# Altium PCB Serilizer_V10.PcbDoc
Units mm, origin at the board's own origin, x right, y up, seen from the top; angles counter-clockwise.
Board outline 32.5 x 29 mm, 4 copper layers (L1 TOP, L2 GND/POWER, L3 GND, L4 BOTTOM), stack 1.584 mm thick; 55 components, 30 nets, 154 pads, 136 vias.
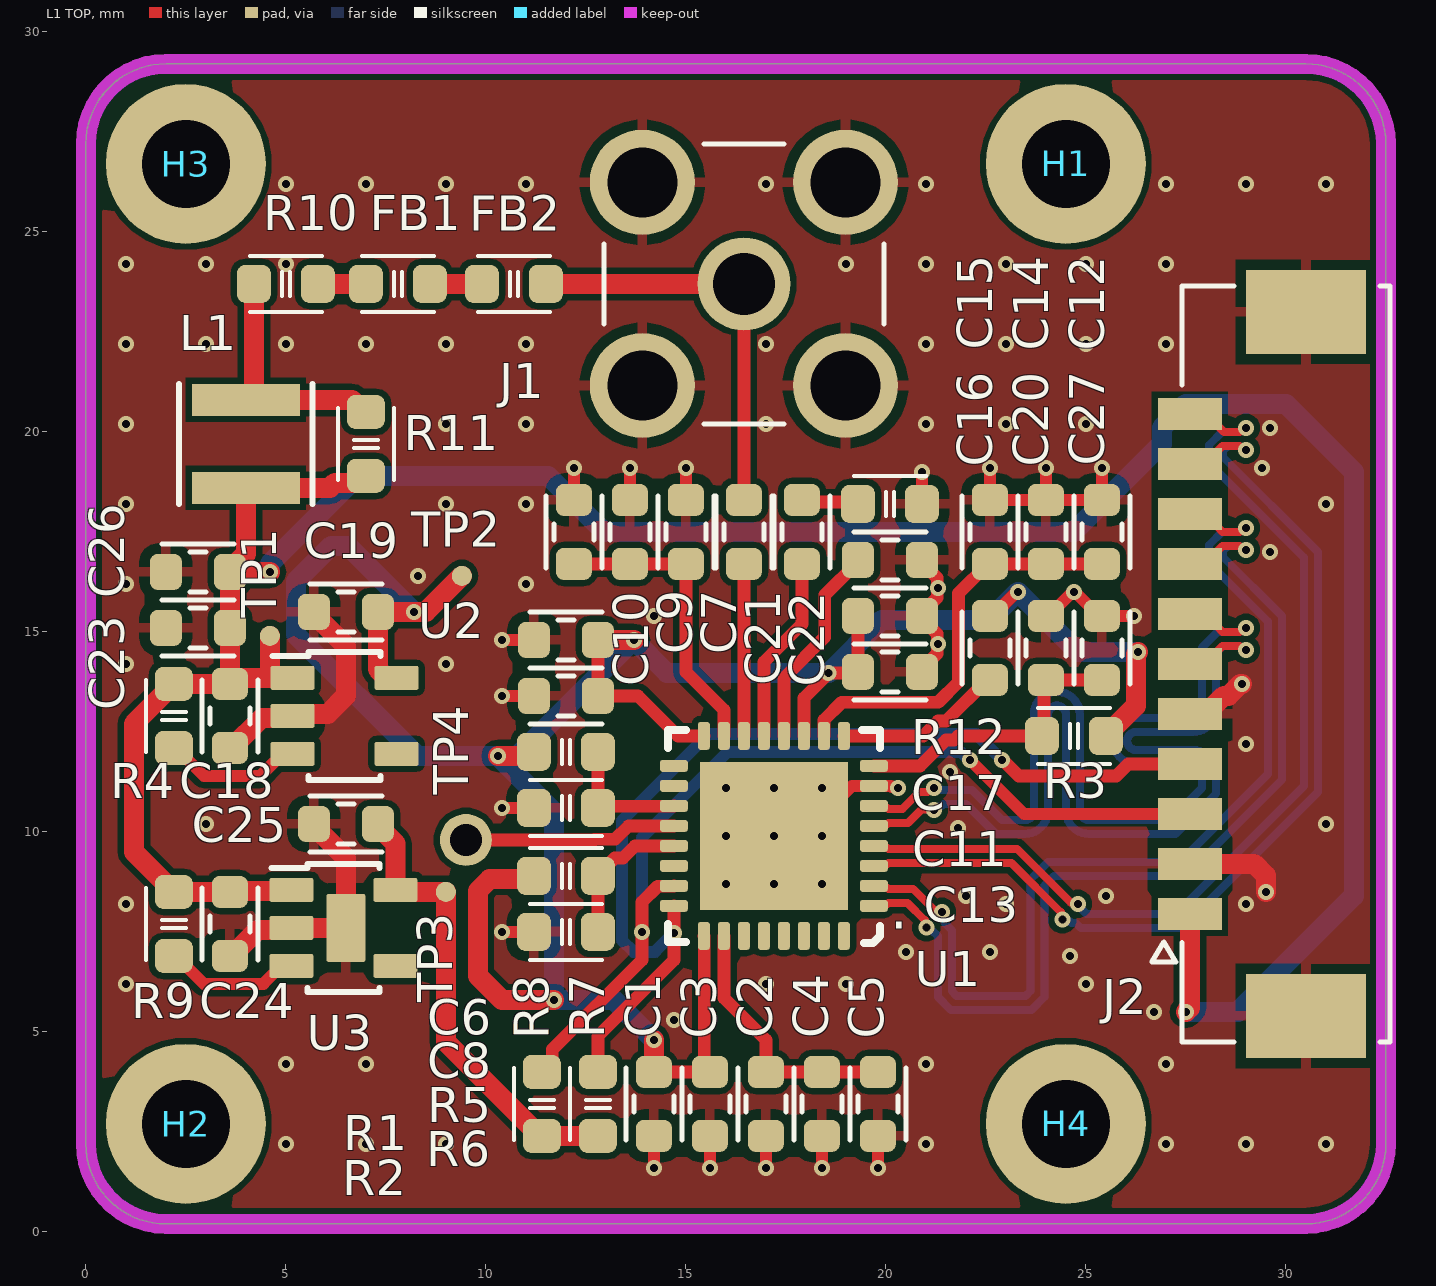
[diagram p0: L1 TOP view]
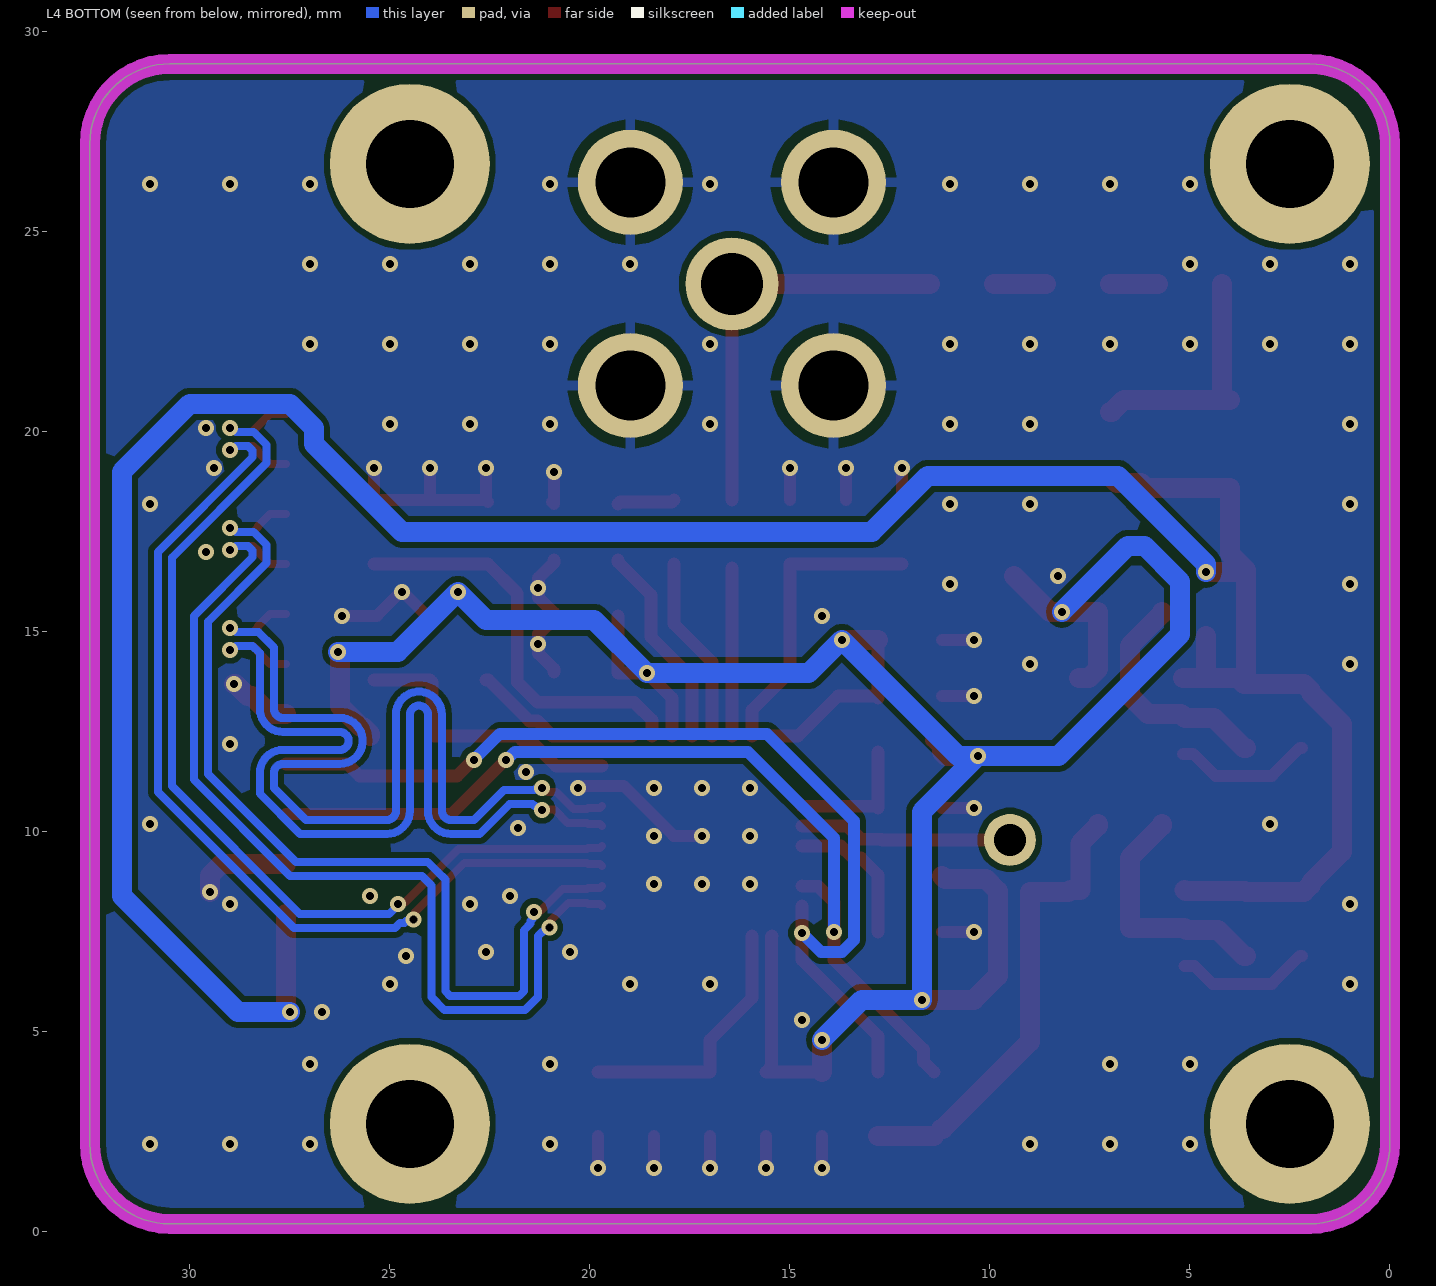
[diagram p1: L4 BOTTOM view, seen from below]
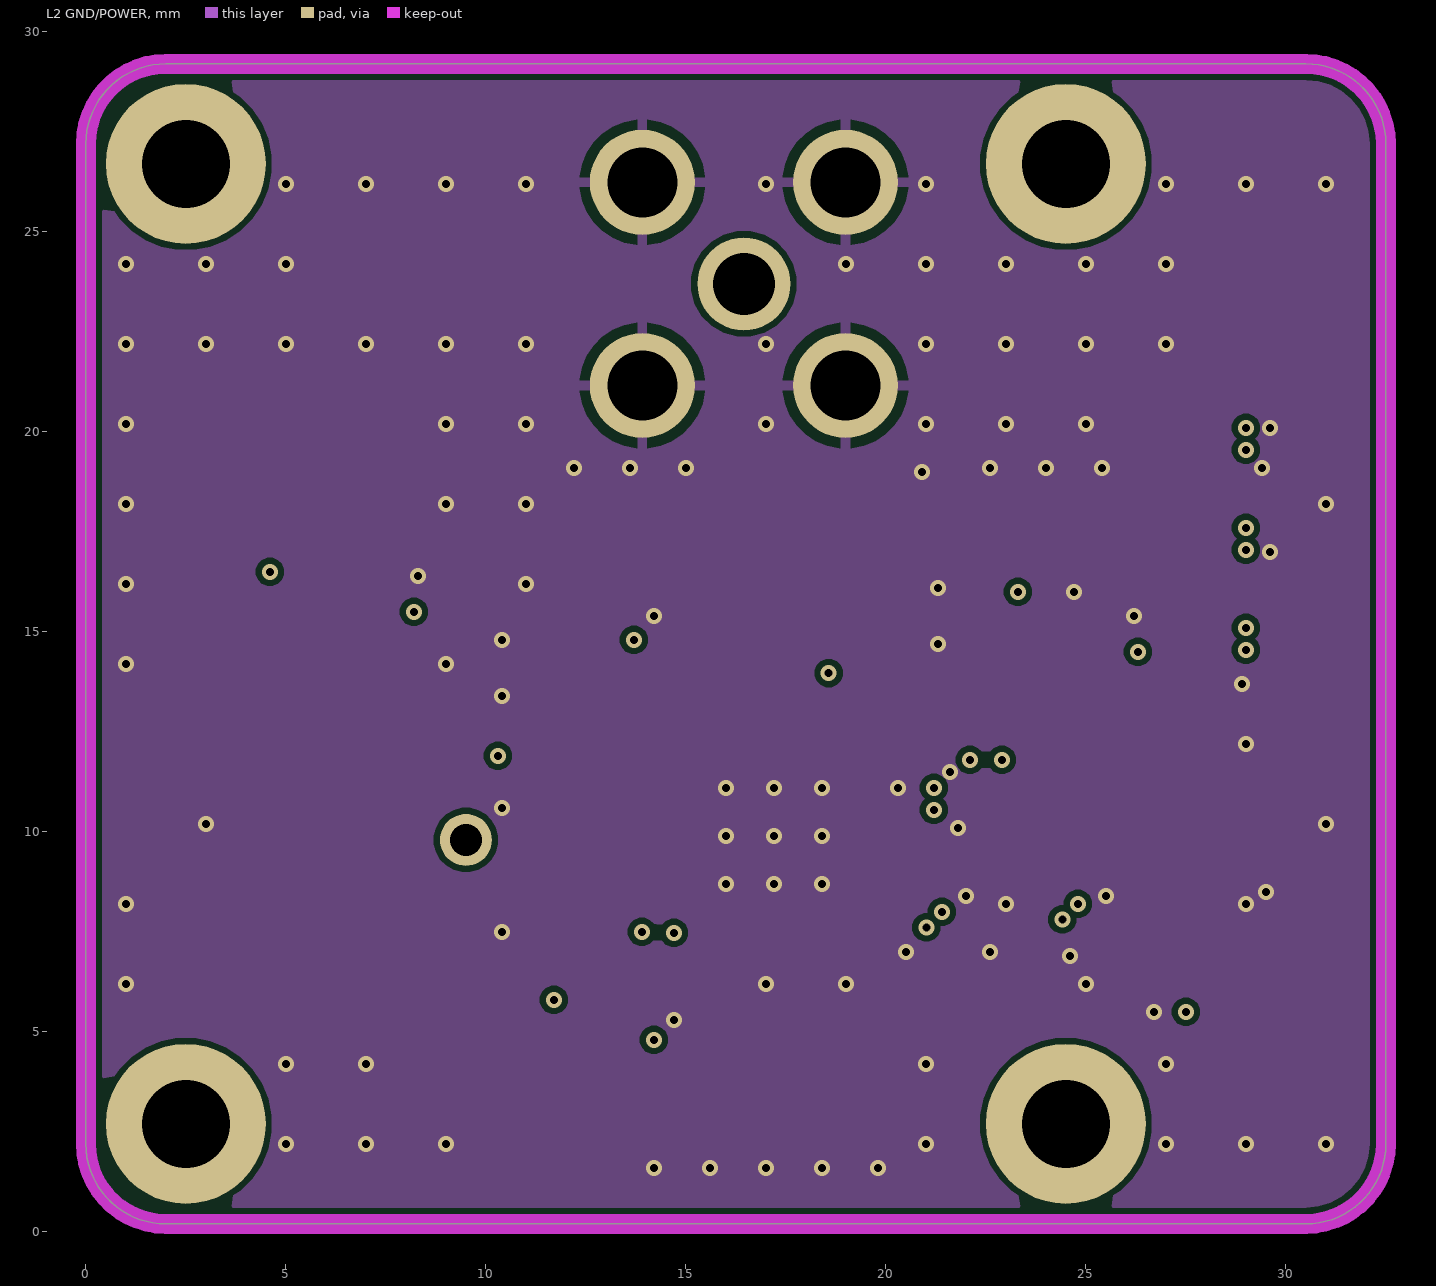
[diagram p2: L2 GND/POWER]
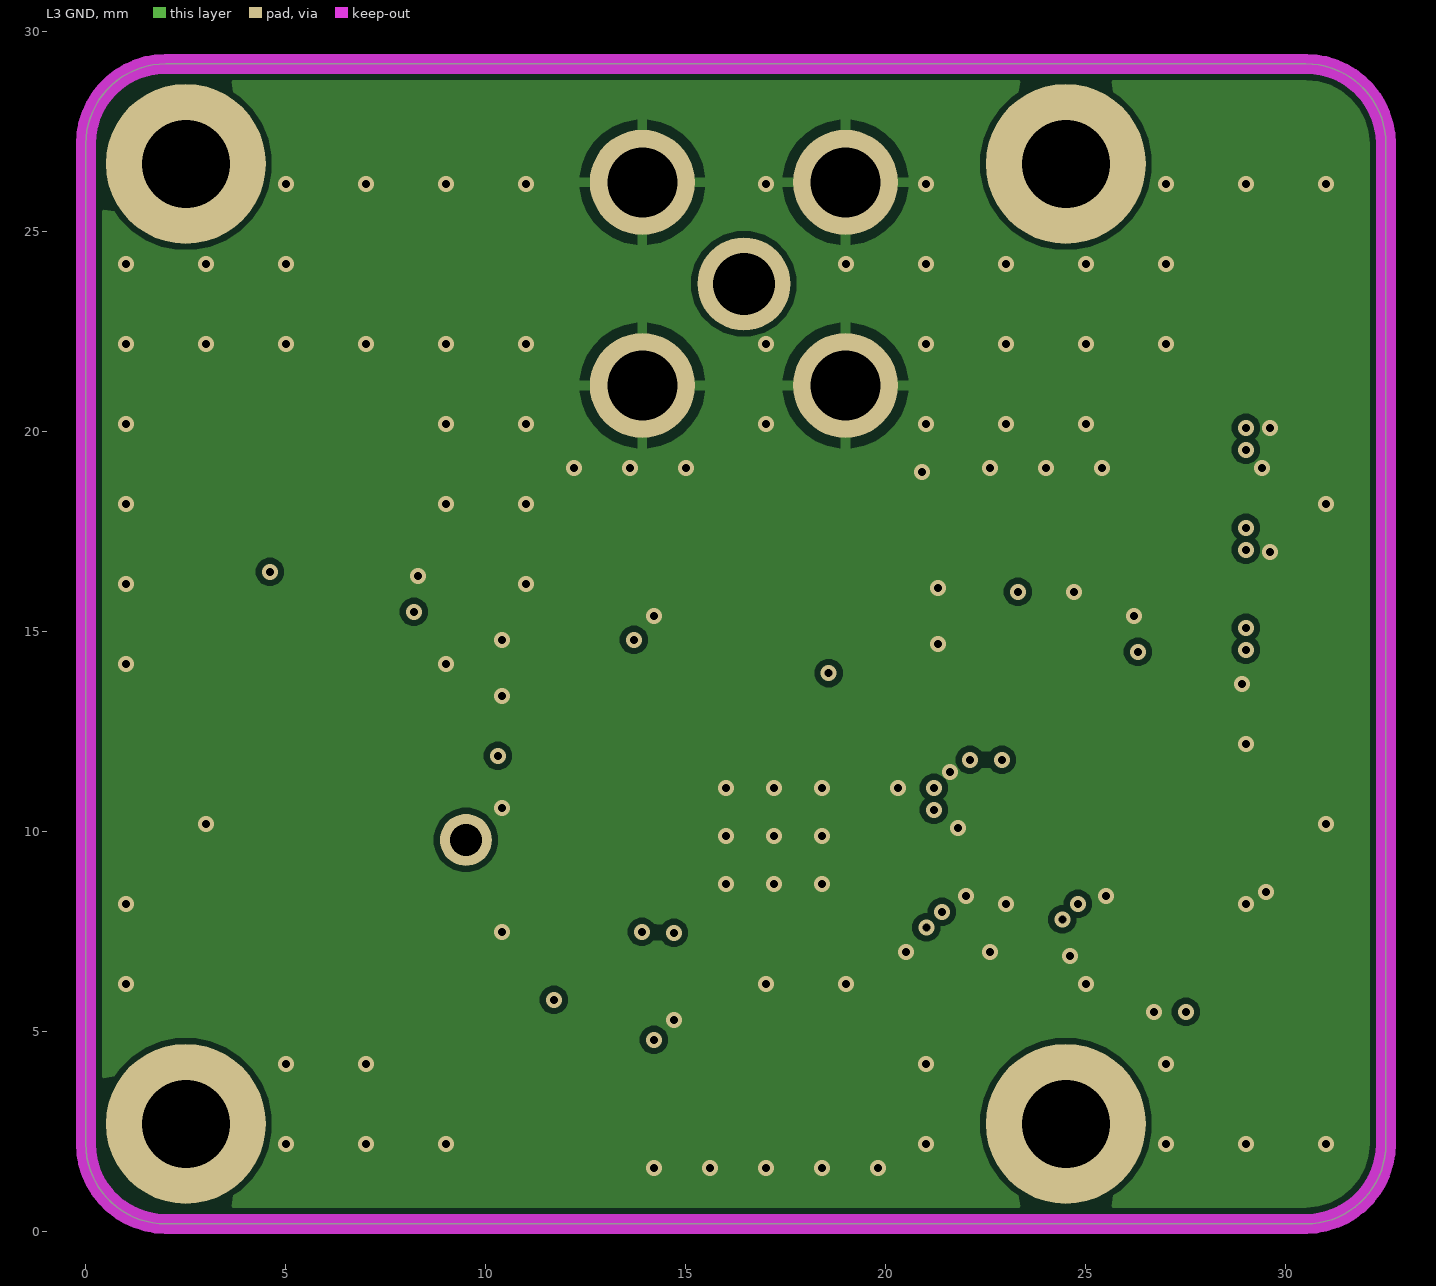
[diagram p3: L3 GND]
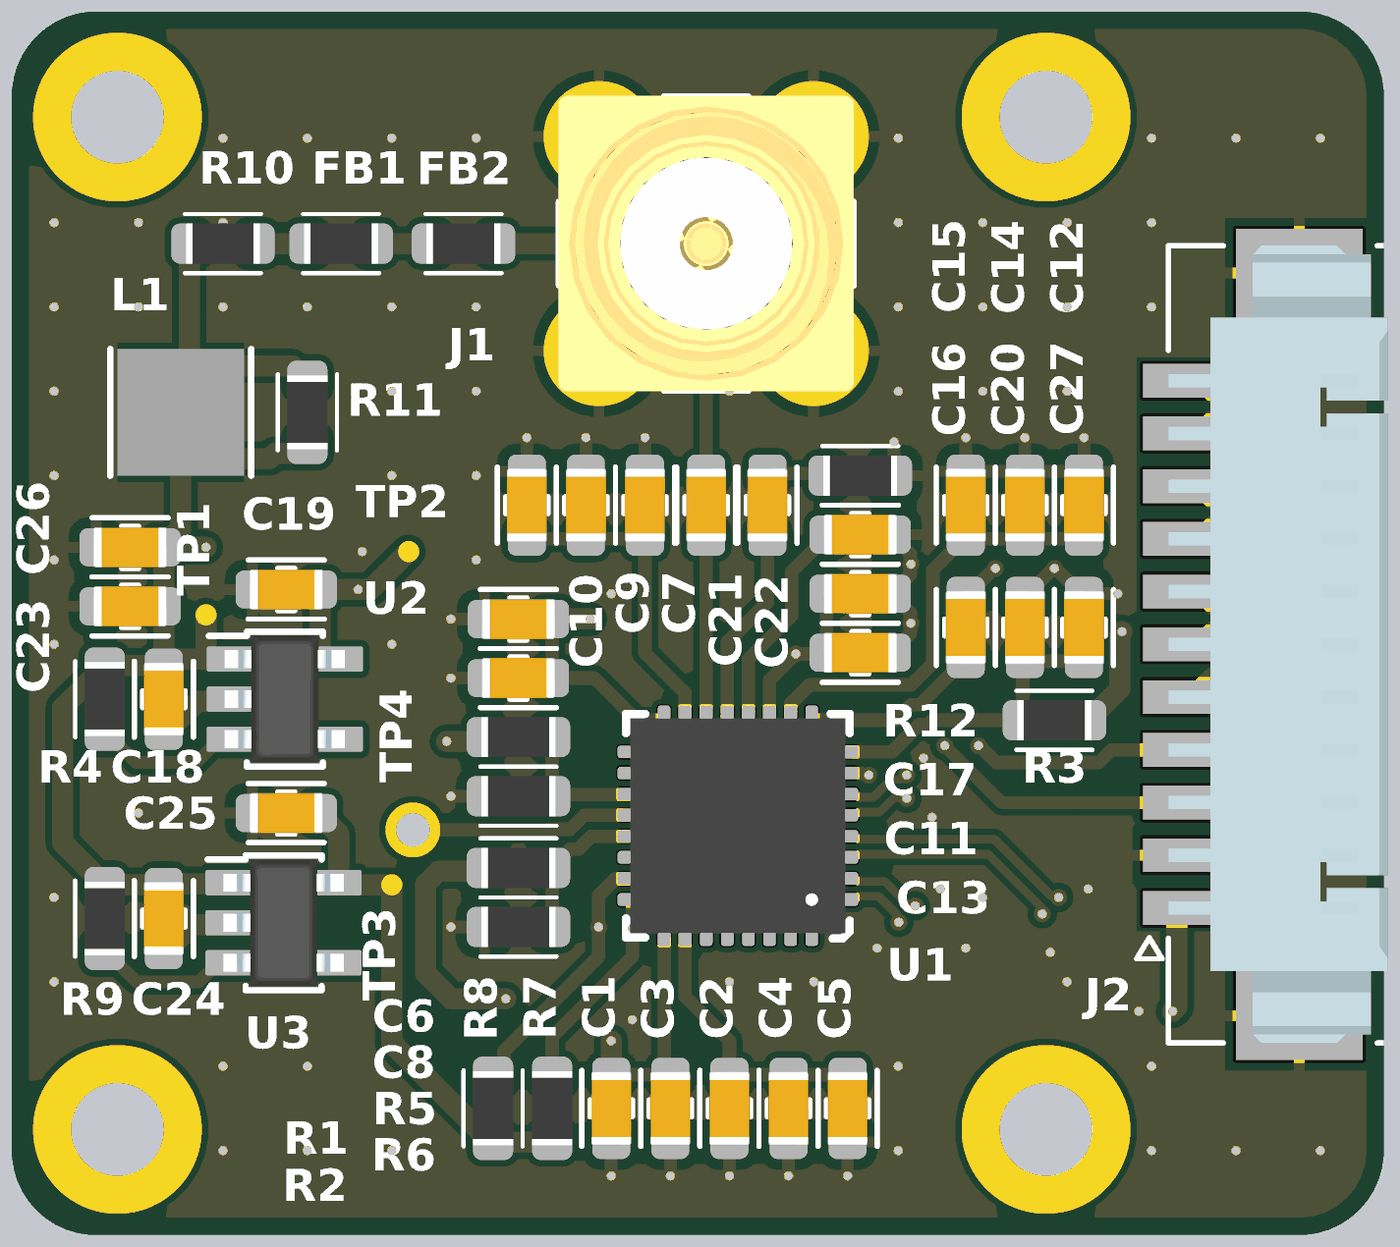
[diagram p4: 3D render of the assembled board from above, using the file's embedded part models]

## Layer stack, top to bottom
Top Solder: solder mask 0.0102, Solder Resist, Dk 3.5
L1 TOP: signal copper 0.04
Dielectric 2: prepreg 0.2, PP-006, Dk 4.5
L2 GND/POWER: signal copper 0.032
Dielectric 1: dielectric 1.04, FR-4, Dk 4.8
L3 GND: signal copper 0.032
Dielectric 3: prepreg 0.2, PP-006, Dk 4.5
L4 BOTTOM: signal copper 0.04
Bottom Solder: solder mask 0.0102, Solder Resist, Dk 3.5

## Board outline
0,2.2 0,27.2 cw(c2,27.2) 2,29.2 30.5,29.2 cw(c30.5,27.2) 32.5,27.2 32.5,2.2 cw(c30.5,2.2) 30.5,0.2 2,0.2 cw(c2,2.2)

## Design rules (kind name [scope] priority, off if disabled: settings)
Clearance [All] p1: gap=0.15 ignorepadtopadclearanceinfootprint=FALSE
DiffPairsRouting [InDifferentialPairClass('DIFF100')] p1: maxlimit=0.15 minlimit=0.127 mostfreqgap=0.15 toplayer_mingap=0.15 toplayer_minwidth=0.2 toplayer_maxwidth=0.2 toplayer_prefwidth=0.2 midlayer1_maxgap=0.127 midlayer1_prefgap=0.127 midlayer1_minwidth=0.069 midlayer1_maxwidth=0.069 midlayer1_prefwidth=0.069 midlayer2_maxgap=0.127 midlayer2_prefgap=0.127 midlayer2_minwidth=0.069 midlayer2_maxwidth=0.069 midlayer2_prefwidth=0.069 bottomlayer_mingap=0.15 bottomlayer_minwidth=0.2 bottomlayer_maxwidth=0.2 bottomlayer_prefwidth=0.2 impedanceprofiledriven=TRUE impedanceprofileid={50D43195-B933-46E9-9240-D5212A9A5187} impedanceprofilevalue=100.000000 maxuncoupledlength=12.7
MatchedLengths MatchedLengths_1 [InNetClass('MIPI1')] p1: tolerance=0.15 checknetsindiffpair=FALSE checkdiffpairvsdiffpair=TRUE checkxsignals=TRUE checkothers=TRUE
MatchedLengths [InNetClass('DIFF100')] p2: tolerance=0.05 checknetsindiffpair=TRUE checkdiffpairvsdiffpair=FALSE checkxsignals=FALSE checkothers=FALSE
MinimumSolderMaskSliver [All] p1: minsoldermaskwidth=0.12
PolygonConnect PolygonConnect_GND [InNet('GND')] p1: thpad.connectstyle=Relief thpad.reliefconductorwidth=0.254 thpad.reliefentries=4 thpad.polygonreliefangle="90 Angle" thpad.airgapwidth=0.254 smdpad.connectstyle=Relief smdpad.reliefconductorwidth=0.254 smdpad.reliefentries=4 smdpad.polygonreliefangle="90 Angle" smdpad.airgapwidth=0.254 via.connectstyle=Direct via.reliefconductorwidth=0.254 via.reliefentries=4 via.polygonreliefangle="90 Angle" via.airgapwidth=0.254
PolygonConnect [All] p2: connectstyle=Relief reliefconductorwidth=0.254 reliefentries=4 polygonreliefangle="90 Angle" airgapwidth=0.254
RoutingVias [All] p1: holewidth=0.2 width=0.4 viastyle="Through Hole" minholewidth=0.2 minwidth=0.4 maxholewidth=0.2 maxwidth=0.4
SilkToSilkClearance [All] p1: silktosilkclearance=0.15
SilkToSolderMaskClearance [IsPad] p1: minsilkscreentomaskgap=0.12 clearancetoexposedcopper=FALSE
SolderMaskExpansion [All] p1: expansion=0 istentingtop=FALSE
SupplyNets "Schematic Supply Nets_3" [InNet('+5V')] p1: voltage=0.000
SupplyNets "Schematic Supply Nets_2" [InNet('GND')] p2: voltage=0.000
SupplyNets "Schematic Supply Nets_1" [InNet('+3.3V')] p3: voltage=0.000
SupplyNets "Schematic Supply Nets" [InNet('+1.8V')] p4: voltage=0.000
Width [All] p1: maxlimit=0.5 minlimit=0.2 preferedwidth=0.3
26 further rules are at their usual default settings.

## Classes and differential pairs
differential pair class DIFF100: CAM_CK CAM_D0 CAM_D1
net class DIFF100: CAM_CK_N CAM_CK_P CAM_D0_N CAM_D0_P CAM_D1_N CAM_D1_P
net class MIPI1: CAM_CK_N CAM_CK_P CAM_D0_N CAM_D0_P CAM_D1_N CAM_D1_P
differential pair CAM_D1: +CAM_D1_P -CAM_D1_N
differential pair CAM_D0: +CAM_D0_P -CAM_D0_N
differential pair CAM_CK: +CAM_CK_P -CAM_CK_N

## Components (designator, comment, footprint, x,y, rotation, side; value= is the part's Value field where it differs from the comment)
C1 "10uF/10V" CAP_C_1608X80 14.2,3.2 r90 top
C2 "10uF/10V" CAP_C_1608X80 17,3.2 r90 top
C3 "0.01uF/10V" CAP_C_1608X80 15.6,3.2 r90 top
C4 "0.01uF/10V" CAP_C_1608X80 18.4,3.2 r90 top
C5 "0.1uF/10V" CAP_C_1608X80 19.8,3.2 r90 top
C6 "10uF/10V" CAP_C_1608X80 12,14.8 r0 top
C7 "10uF/10V" CAP_C_1608X80 15,17.5 r270 top
C8 "0.01uF/10V" CAP_C_1608X80 12,13.4 r0 top
C9 "0.01uF/10V" CAP_C_1608X80 13.6,17.5 r270 top
C10 "0.1uF/10V" CAP_C_1608X80 12.2,17.5 r270 top
C11 "10uF/10V" CAP_C_1608X80 20.1,15.4 r180 top
C12 "10uF/10V" CAP_C_1608X80 25.4,17.5 r270 top
C13 "0.01uF/10V" CAP_C_1608X80 20.1,14 r180 top
C14 "0.01uF/10V" CAP_C_1608X80 24,17.5 r270 top
C15 "0.1uF/10V" CAP_C_1608X80 22.6,17.5 r270 top
C16 "0.022uF/10V" CAP_C_1608X80 22.6,14.6 r90 top
C17 "0.1uF/10V" CAP_C_1608X80 20.1,16.8 r180 top
C18 "10uF/10V" CAP_C_1608X80 3.6,12.9 r90 top
C19 "10uF/10V" CAP_C_1608X80 6.5,15.5 r0 top
C20 "10uF/10V" CAP_C_1608X80 24,14.6 r270 top
C21 "0.033uF/10V" CAP_C_1608X80 16.45,17.5 r90 top
C22 "0.015uF/10V" CAP_C_1608X80 17.9,17.5 r90 top
C23 "10uF/10V" CAP_C_1608X80 2.8,15.1 r0 top
C24 "10uF/10V" CAP_C_1608X80 3.6,7.7 r90 top
C25 "10uF/10V" CAP_C_1608X80 6.5,10.2 r0 top
C26 "0.1uF/10V" CAP_C_1608X80 2.8,16.5 r0 top
C27 "10uF/10V" CAP_C_1608X80 25.4,14.6 r270 top
FB1 "330R@100MHz" IND_C_1608X60 7.8,23.7 r180 top value="600 Ohms @ 100 MHz"
FB2 "47R@100MHz" IND_C_1608X60 10.7,23.7 r180 top value="600 Ohms @ 100 MHz"
H1 "M2" HEX-2.2mm 24.5,26.7 r0 top
H2 "M2" HEX-2.2mm 2.5,2.7 r0 top
H3 "M2" HEX-2.2mm 2.5,26.7 r0 top
H4 "M2" HEX-2.2mm 24.5,2.7 r0 top
J1 "RFPC-SMA28-F" GRADCONN_RFPC-SMA28-F 16.45,23.7 r270 top
J2 "0532611171" MOLEX_0532611171 30,14.2 r90 top locked
L1 "10uH" IND300X300X150 4,19.7 r90 top
R1 "DNP/0R" RES_C_1608X60 12,8.9 r0 top
R2 "10k" RES_C_1608X60 12,7.5 r180 top
R3 "10k" RES_C_1608X60 24.7,12.4 r180 top
R4 "10k" RES_C_1608X60 2.2,12.9 r270 top
R5 "82.5k" RES_C_1608X60 12,12 r180 top
R6 "102k" RES_C_1608X60 12,10.6 r0 top
R7 "DNP/4.7k" RES_C_1608X60 12.8,3.2 r90 top
R8 "DNP/4.7k" RES_C_1608X60 11.4,3.2 r90 top
R9 "10k" RES_C_1608X60 2.2,7.7 r90 top
R10 "0R" RES_C_1608X60 5,23.7 r0 top
R11 "4.02k" RES_C_1608X60 7,19.7 r270 top
R12 "49.9R" RES_C_1608X60 20.1,18.2 r0 top
TP1 "" Testpoint_50 4.6,14.9 r90 top
TP2 "" Testpoint_50 9.4,16.4 r90 top
TP3 "" Testpoint_50 9,8.5 r90 top
TP4 "" Testpoint_TH_D130H80 9.5,9.8 r90 top
U1 "DS90UB953TRHBTQ1" QFN-32_5X5_EP3.7X3.7 17.2,9.9 r180 top
U2 "TLV75518PDBVR" SOT25 6.466,12.901 r0 top
U3 "DNP/TLV75733PDYDR" SOT25-EPAD 6.438,7.6 r0 top

## Footprints (in the part's own frame and the unit in brackets; to place one, negate y for a bottom-side part, rotate by r counter-clockwise, add the part's x,y. Pads: shape width x height; smd on the part's side, far side on the other; paste and mask are expansions set on the pad)
CAP_C_1608X80 [mm] "Chip Capacitor, 2-Leads, Body 1.60x0.80mm, IPC Medium Density"
  rrect50% 0.8x0.9 smd: 1(-0.8,0) 2(0.8,0)
  silkscreen extent -0.9,-0.7 0.9,0.7, body extent -0.87,-0.48 0.87,0.48, height 0.85
GRADCONN_RFPC-SMA28-F [mm]
  round 2.325 hole 1.55: 1(0,0)
  round 2.625 hole 1.75: G1(-2.54,2.54) G2(2.54,2.54) G3(-2.54,-2.54) G4(2.54,-2.54)
  silkscreen extent -3.5,-3.5 3.5,3.5, body extent -3.5,-3.5 3.5,3.5, height 9.6
HEX-2.2mm [mm]
  round 4 hole 2.2: 1(0,0)
IND300X300X150 [mm]
  rect 0.8x2.7 smd: 1(-1.1,0) 2(1.1,0)
  silkscreen extent -1.5,-1.67 1.5,1.67, body extent -1.5,-1.5 1.5,1.5, height 1.5
IND_C_1608X60 [mm] "Chip Resistor, 2-Leads, Body 1.63x0.83mm, IPC High Density"
  rrect50% 0.85x0.95 smd: 1(-0.8,0) 2(0.8,0)
  silkscreen extent -0.9,-0.7 0.9,0.7, body extent -0.87,-0.48 0.87,0.48, height 0.6
MOLEX_0532611171 [mm]
  rect 0.8x1.6 smd mask+0.076: 1(-6.25,2.4) 2(-5,2.4) 3(-3.75,2.4) 4(-2.5,2.4) 5(-1.25,2.4) 6(0,2.4) 7(1.25,2.4) 8(2.5,2.4) 9(3.75,2.4) 10(5,2.4) 11(6.25,2.4)
  rect 2.1x3 smd mask+0.076: M1(-8.8,-0.5) M2(8.8,-0.5)
  silkscreen extent -9.45,-2.6 9.45,3.35, body extent -9.45,-2.6 9.45,2.6, height 3.4
QFN-32_5X5_EP3.7X3.7 [mm] "QFN32_5MMwith ePAD"
  rrect50% 0.7x0.3 smd mask+0.04: 1(-2.5,1.75) 2(-2.5,1.25) 3(-2.5,0.75) 4(-2.5,0.25) 5(-2.5,-0.25) 6(-2.5,-0.75) 7(-2.5,-1.25) 8(-2.5,-1.75) 17(2.5,-1.75) 18(2.5,-1.25) 19(2.5,-0.75) 20(2.5,-0.25) 21(2.5,0.25) 22(2.5,0.75) 23(2.5,1.25) 24(2.5,1.75)
  rrect50% 0.3x0.7 smd mask+0.04: 9(-1.75,-2.5) 10(-1.25,-2.5) 11(-0.75,-2.5) 12(-0.25,-2.5) 13(0.25,-2.5) 14(0.75,-2.5) 15(1.25,-2.5) 16(1.75,-2.5) 25(1.75,2.5) 26(1.25,2.5) 27(0.75,2.5) 28(0.25,2.5) 29(-0.25,2.5) 30(-0.75,2.5) 31(-1.25,2.5) 32(-1.75,2.5)
  rect 3.7x3.7 smd mask+0.05: 33(0,0)
  silkscreen extent -2.65,-2.65 2.65,2.68, body extent -2.56,-2.56 2.56,2.56, height 1.01
RES_C_1608X60 [mm] "Chip Resistor, 2-Leads, Body 1.63x0.83mm, IPC High Density"
  rrect50% 0.85x0.95 smd: 1(-0.8,0) 2(0.8,0)
  silkscreen extent -0.9,-0.7 0.9,0.7, body extent -0.87,-0.48 0.87,0.48, height 0.6
SOT25 [mm]
  rrect16% 1.1x0.6 smd paste+0 mask+0: 1(-1.3,0.95) 2(-1.3,0) 3(-1.3,-0.95) 4(1.3,-0.95) 5(1.3,0.95)
  silkscreen extent -1.8,-1.6 0.9,1.6, body extent -1.43,-1.5 1.43,1.5, height 1.4
SOT25-EPAD [mm]
  rrect16% 1.1x0.6 smd paste+0 mask+0: 1(-1.3,0.95) 2(-1.3,0) 3(-1.3,-0.95) 4(1.3,-0.95) 5(1.3,0.95)
  rrect10% 0.975x1.7 smd paste+0 mask+0: 7(0.062,0)
  silkscreen extent -1.8,-1.6 0.9,1.6, body extent -1.43,-1.5 1.43,1.5, height 1.4
Testpoint_50 [mm]
  round 0.5 smd paste-2539.97 mask+0: 1(0,0)
Testpoint_TH_D130H80 [mm]
  round 1.3 hole 0.8 paste-2539.97 mask+0: 1(0,0)

## Part data
C1 C2 C6 C7 C11 C12 C18 C19 C20 C23 C24 C25 C27: library part _CAP_C_High_2, "CAP High Value"
C3 C4 C5 C8 C9 C10 C13 C14 C15 C16 C17 C21 C22 C26: library part _CAP_C_2, "CAP"
FB1 FB2: library part BLM18AG601SN1D, "FERRITE BEAD 600 OHM 0603 1LN", Current Rating (Max)=500mA, DC Resistance (DCR) (Max)=380mOhm, Device Package="0603 (1608 Metric)", Impedance @ Frequency="600 Ohms @ 100 MHz", Manufacturer="Murata Electronics", Operating Temperature="-55°C ~ 125°C", Supplier Part Number 1=490-1014-1-ND, ComponentLink1Description=Datasheet, ComponentLink1URL=https://www.murata.com/en-us/products/productdata/8796738650142/ENFA0003.pdf, ComponentLink2Description="DigiKey Link", ComponentLink2URL=https://www.digikey.com/en/products/detail/murata-electronics/BLM18AG601SN1D/584225, Height (Max)="0.037\" (0.95mm)", lastupdated="7/10/2022 9:43:27 AM", Lifecycle Status=Active, Minimum Order=1, Mounting Type="Surface Mount", Number of Lines=1, Package / Case="0603 (1608 Metric)", Packaging=TapeAndReel, Part Number=BLM18AG601SN1D, Part Status=Active, partid=848, Price=0.02, Series="EMIFIL®, BLM18", Size / Dimension="0.063\" L x 0.032\" W (1.60mm x 0.80mm)", Supplier 1=DigiKey
H1 H2 H3 H4: library part HEX-M3
J1: "SMA Connector Jack, Female Socket 50 Ohms Panel Mount, Through Hole Solder", Package=None, Check_prices=https://www.snapeda.com/parts/RFPC-SMA28-F/GradConn/view-part/?ref=eda, MF=GradConn, MP=RFPC-SMA28-F, SnapEDA_Link=https://www.snapeda.com/parts/RFPC-SMA28-F/GradConn/view-part/?ref=snap
J2: library part "Header 11x1_2M"
L1: library part _IND
R1 R2 R3 R4 R5 R6 R7 R8 R10 R11 R12: library part _RES_B_2, "RES"
R9: library part RES-SMD, "RES-Chip", Manufacturer="Generic Components", Class=Passive, Published=08/06/2000, Publisher="Altium Hobart Technology Centre"
TP1 TP2 TP3 TP4: library part "Test Point", "Test Point", Solder=NF
U1: library part IC_Serializer_DS90UB953TRHBTQ1, "2 MP MIPIÂ® CSI-2 FPD-Link III serializer for 2MP/60fps cameras & radar 32-VQFN -40 to 105", Manufacturer_Name="Texas Instruments", Copyright="Copyright (C) 2026 Ultra Librarian. All rights reserved.", Datasheet=https://www.ti.com/lit/gpn/ds90ub953-q1, Manufacturer_Part_Number=DS90UB953TRHBTQ1, RefDes=RefDes, TYPE=Type
U2: library part IC_POWER_AP7347DQ
U3: library part IC_POWER_TLV75733PDYDR

## Via types
v1: diameter 0.4, hole 0.2, L1 TOP to L4 BOTTOM, tented both sides, 136 vias

## Nets (pads, with @x,y where several pads share a name; then routed paths per layer and width w, separated by ;. In a path a pad name is that pad's centre, name@x,y a point inside that pad or via, vN(x,y) a via of type N, cw(c..) or ccw(c..) an arc to the next point about the centre after c; other vN are vias at no path point)
+1.8V: C1.2 C3.2 C6.2 C8.2 C11.2 C13.2 C16.2 C19.2 R1.1 R3.1 R5.2 TP2.1 U1.11 U1.16 U1.25 U2.5 | length 70.3
  L1 TOP w0.32: R5.2@11.2,12.022 R5.2@11.461,12.283 ; C8.2@12.8,13.35 C8.2 ; C6.2 C8.2 ; C1.2 C3.2 15.46,4.14 15.46,7.39 U1.25 ; U1.16 14.8,12.4 13.8,13.4 C8.2 ; U1.11 17.95,13.35 v1(18.572,13.972) 19.3,13.972 C11.2 ; C16.2 22.672,15.4 23.256,15.985 23.285,15.985 v1(23.3,16)
  L1 TOP w0.5: C19.2 7.3,14.067 7.516,13.851 U2.5 ; C19.2 v1(8.2,15.5) ; v1(8.2,15.5) 8.5,15.5 TP2.1 ; v1(10.3,11.9) 11.1,11.9 R5.2 ; R1.1 11.117,8.817 10.093,8.817 9.8,8.524 9.8,6.4 10.4,5.8 v1(11.7,5.8) ; C6.2 v1(13.7,14.8) ; C1.2 v1(14.2,4.8) ; R3.1 25.5,12.45 25.675,12.625 25.725,12.625 26.25,13.15 26.25,14.45 v1(26.3,14.5)
  L4 BOTTOM w0.5: v1(8.2,15.5) 6.55,17.15 6.136,17.15 5.25,16.264 5.25,14.931 8.281,11.9 v1(10.3,11.9) ; v1(14.2,4.8) 13.2,5.8 v1(11.7,5.8) 11.7,10.5 v1(10.3,11.9) ; v1(26.3,14.5) 24.8,14.5 v1(23.3,16) 22.6,15.3 19.9,15.3 v1(18.572,13.972) 14.528,13.972 v1(13.7,14.8) 10.8,11.9 v1(10.3,11.9)
+3.3V: C25.2 R7.1 R8.1 TP3.1 U3.5 | length 11.4
  L1 TOP w0.5: C25.2 7.3,10.15 7.738,9.713 U3.5 7.988,8.55 8.038,8.5 TP3.1 9,4.75 11.175,2.575 R8.1@11.225,2.575 ; R8.1 R7.1
+5V: C18.2 C23.2 C24.2 C26.2 J2.1 L1.1 R4.1 R9.2 R11.2 TP1.1 U2.1 U3.1 | length 71.9
  L1 TOP w0.5: TP1.1 4.6,13.851 ; v1(4.6,16.5) C26.2 ; U3.1 5.113,8.525 3.625,8.525 C24.2 2.15,8.5 1.975,8.675 1.975,8.725 1.2,9.5 1.2,12.7 1.975,13.475 1.975,13.525 2.15,13.7 C18.2 ; U2.1 4.6,13.851 ; R11.2 6.825,18.725 6.225,18.725 6.1,18.6 L1.1 4,16.95 3.6,16.55 C26.2 ; v1(27.5,5.5) 27.6,5.6 J2.1 ; C18.2 C23.2 C26.2 ; C18.2 3.65,13.7 3.801,13.851 4.6,13.851
  L4 BOTTOM w0.5: v1(4.6,16.5) 4.6,16.7 6.8,18.9 11.551,18.9 12.951,17.5 24.7,17.5 26.9,19.7 26.9,20.1 27.5,20.7 30,20.7 31.7,19 31.7,8.4 28.8,5.5 v1(27.5,5.5)
CAM_CK_N: J2.7 U1.6 | length 25.1
  L1 TOP w0.2: U1.6 19.75,10.6 20.042,10.6 20.067,10.575 20.411,10.575 20.836,11 21.046,11 21.146,11.1 v1(21.2,11.1) ; J2.7 28,15.45 28.3,15.15 28.3,15.117 28.417,15 28.846,15 28.946,15.1 v1(29,15.1)
  L4 BOTTOM w0.2: v1(21.2,11.1) 21.238,11.062 21.38,11.062 21.391,11.05 22.15,11.05 22.9,10.3 23.2,10.3 23.475,10.3 ccw(c23.475,10.525) 23.7,10.525 23.7,12.932 cw(c24.275,12.932) 24.85,12.932 24.85,10.525 ccw(c25.075,10.525) 25.075,10.3 26.1,10.3 27.1,10.3 27.9,11.1 27.9,11.2 27.9,11.475 ccw(c27.675,11.475) 27.675,11.7 26.255,11.7 cw(c26.255,12.275) 26.255,12.85 27.675,12.85 ccw(c27.675,13.075) 27.9,13.075 27.9,14.2 27.9,14.611 28.289,15 28.846,15 28.946,15.1 v1(29,15.1)
CAM_CK_P: J2.6 U1.5 | length 25
  L1 TOP w0.2: U1.5 19.75,10.2 20.042,10.2 20.067,10.225 20.556,10.225 20.887,10.556 21.194,10.556 v1(21.2,10.55) ; J2.6 28,14.2 28.3,14.5 28.3,14.533 28.417,14.65 28.846,14.65 28.946,14.55 v1(29,14.55)
  L4 BOTTOM w0.2: v1(21.2,10.55) 21.254,10.55 21.354,10.65 21.388,10.65 21.438,10.7 22.005,10.7 22.755,9.95 23.2,9.95 23.475,9.95 ccw(c23.475,10.525) 24.05,10.525 24.05,12.932 cw(c24.275,12.932) 24.5,12.932 24.5,10.525 ccw(c25.075,10.525) 25.075,9.95 26.1,9.95 27.245,9.95 28.25,10.955 28.25,11.2 28.25,11.475 ccw(c27.675,11.475) 27.675,12.05 26.255,12.05 cw(c26.255,12.275) 26.255,12.5 27.675,12.5 ccw(c27.675,13.075) 28.25,13.075 28.25,14.2 28.25,14.466 28.434,14.65 28.846,14.65 28.946,14.55 v1(29,14.55)
CAM_D0_N: J2.11 U1.4 | length 25
  L1 TOP w0.2: U1.4 19.75,9.6 20.042,9.6 20.067,9.575 23.284,9.575 24.62,8.238 24.762,8.238 v1(24.8,8.2) ; J2.11 28,20.45 28.45,20 28.846,20 28.946,20.1 v1(29,20.1)
  L4 BOTTOM w0.2: v1(24.8,8.2) 24.8,8.167 25.017,7.95 27.255,7.95 30.45,11.145 30.45,16.855 28.083,19.222 28.083,19.678 28.405,20 28.846,20 28.946,20.1 v1(29,20.1)
CAM_D0_P: J2.10 U1.3 | length 25.1
  L1 TOP w0.2: U1.3 19.75,9.2 20.042,9.2 20.067,9.225 23.139,9.225 24.373,7.991 24.373,7.849 v1(24.411,7.811) ; J2.10 28,19.2 28.3,19.5 28.3,19.533 28.417,19.65 28.846,19.65 28.946,19.55 v1(29,19.55)
  L4 BOTTOM w0.2: v1(24.411,7.811) 24.449,7.773 24.591,7.773 24.635,7.728 24.744,7.728 24.872,7.6 27.4,7.6 30.8,11 30.8,17 28.433,19.367 28.433,19.533 28.55,19.65 28.846,19.65 28.946,19.55 v1(29,19.55)
CAM_D1_N: J2.9 U1.2 | length 25
  L1 TOP w0.2: U1.2 19.75,8.6 20.042,8.6 20.067,8.575 20.684,8.575 21.22,8.038 21.362,8.038 v1(21.4,8) ; J2.9 28,17.95 28.3,17.65 28.3,17.617 28.417,17.5 28.846,17.5 28.946,17.6 v1(29,17.6)
  L4 BOTTOM w0.2: v1(21.4,8) 21.438,7.962 21.438,7.82 21.483,7.776 21.483,7.706 21.65,7.539 21.65,6.017 21.767,5.9 23.494,5.9 23.611,6.017 23.611,6.6 23.611,8.806 23.803,8.998 24.055,9.25 27.35,9.25 29.55,11.45 29.55,15.255 28.083,16.722 28.083,17.178 28.405,17.5 28.846,17.5 28.946,17.6 v1(29,17.6)
CAM_D1_P: J2.8 U1.1 | length 25
  L1 TOP w0.2: U1.1 19.75,8.2 20.042,8.2 20.067,8.225 20.539,8.225 20.973,7.791 20.973,7.649 v1(21.011,7.611) ; J2.8 28,16.7 28.3,17 28.3,17.033 28.417,17.15 28.846,17.15 28.946,17.05 v1(29,17.05)
  L4 BOTTOM w0.2: v1(21.011,7.611) 21.065,7.611 21.165,7.511 21.183,7.511 21.3,7.394 21.3,5.872 21.622,5.55 23.639,5.55 23.961,5.872 23.961,6.6 23.961,8.661 24.2,8.9 25.061,8.9 27.495,8.9 29.9,11.305 29.9,15.4 28.433,16.867 28.433,17.033 28.55,17.15 28.846,17.15 28.946,17.05 v1(29,17.05)
CAM_I2C_SCL: J2.4 R7.2 U1.24 | length 25.2
  L1 TOP w0.32: R7.2 12.8,4.9 14.7,6.8 v1(14.7,7.475) U1.24 ; v1(22.9,11.8) 22.922,11.8 23.322,11.4 25.758,11.4 26.058,11.7 J2.4
  L4 BOTTOM w0.3: v1(14.7,7.475) 14.225,7 13.693,7 13.4,7.293 13.4,10.275 15.575,12.45 22.25,12.45 v1(22.9,11.8)
CAM_I2C_SDA: J2.3 R8.2 U1.23 | length 23.8
  L1 TOP w0.3: v1(22.1,11.8) 23.45,10.45 J2.3
  L1 TOP w0.32: R8.2 11.657,4.257 11.657,4.557 13.9,6.8 v1(13.9,7.5) 13.9,8.244 14.296,8.64 14.69,8.64 U1.23
  L4 BOTTOM w0.3: v1(13.9,7.5) 13.9,9.85 16.05,12 21.874,12 22.074,11.8 v1(22.1,11.8)
DOUT: C21.2 FB2.1 J1.1 | length 10.3
  L1 TOP w0.32: C21.2 J1.1
  L1 TOP w0.5: FB2.1 J1.1
GND: C1.1 C2.1 C3.1 C4.1 C5.1 C6.1 C7.1 C8.1 C9.1 C10.1 C11.1 C12.1 C13.1 C14.1 C15.1 C17.1 C18.1 C19.1 C20.1 C23.1 C24.1 C25.1 C26.1 C27.1 J1.G1 J1.G2 J1.G3 J1.G4 J2.2 J2.5 J2.M1 J2.M2 R2.2 R6.1 R12.2 U1.7 U1.33 U2.2 U3.2 U3.7 | length 41.6
  L1 TOP w0.3: v1(10.4,7.5) R2.2 ; v1(10.4,10.6) R6.1 ; v1(10.4,13.4) C8.1 ; v1(10.4,14.8) C6.1 ; C10.1 v1(12.2,19.1) ; C9.1 v1(13.6,19.1) ; v1(14.2,1.6) C1.1 ; C7.1 v1(15,19.1) ; v1(15.6,1.6) C3.1 ; v1(17,1.6) C2.1 ; v1(17.2,9.9) 17.907,9.9 19.157,11.15 20.123,11.15 20.154,11.119 20.281,11.119 v1(20.3,11.1) ; v1(18.4,1.6) C4.1 ; v1(19.8,1.6) C5.1 ; v1(20.9,19) R12.2 R12.2@20.95,18.25 ; C15.1@22.55,18.25 C15.1 ; v1(22.6,19.1) C15.1 ; C20.1 24.075,15.4 24.675,16 24.725,16 25.325,15.4 v1(26.2,15.4) v1@26.227,15.4 ; v1(24,19.1) C14.1 ; v1(25.4,19.1) C12.1 C14.1 ; C15.1 C14.1
  L1 TOP w0.32: C13.1 20.9,14.072 21.285,14.456 21.285,14.685 v1(21.3,14.7) 21.285,14.715 21.285,14.944 20.9,15.328 20.9,15.472 21.285,15.856 21.285,16.085 v1(21.3,16.1) 21.285,16.115 21.285,16.344 20.9,16.728 C17.1
  L1 TOP w0.5: C24.1 3.65,6.9 4.3,7.55 5.088,7.55 U3.2 U3.7 6.5,9.35 5.7,10.15 C25.1 ; C18.1 3.65,12.1 4.401,12.851 5.116,12.851 U2.2 5.216,12.951 6.051,12.951 6.5,13.4 6.5,14.65 5.7,15.45 C19.1 ; J2.2 29.207,9.2 29.5,8.907 v1(29.5,8.5) ; J2.5 28,12.95 28.45,13.4 28.566,13.4 28.866,13.7 v1(28.9,13.7)
  other v1: 5,2.2 7,2.2 9,2.2 21,2.2 27,2.2 29,2.2 31,2.2 5,4.2 7,4.2 21,4.2 27,4.2 14.7,5.3 26.7,5.5 1,6.2 17,6.2 19,6.2 25,6.2 24.6,6.9 20.5,7 22.6,7 1,8.2 23,8.2 29,8.2 22,8.4 25.5,8.4 16,8.7 17.2,8.7 18.4,8.7 16,9.9 18.4,9.9 21.8,10.1 3,10.2 31,10.2 16,11.1 17.2,11.1 18.4,11.1 21.6,11.5 29,12.2 1,14.2 9,14.2 14.2,15.4 24.7,16 1,16.2 11,16.2 8.3,16.4 29.6,17 1,18.2 9,18.2 11,18.2 31,18.2 29.4,19.1 29.6,20.1 1,20.2 9,20.2 11,20.2 17,20.2 21,20.2 23,20.2 25,20.2 1,22.2 3,22.2 5,22.2 7,22.2 9,22.2 11,22.2 17,22.2 21,22.2 23,22.2 25,22.2 27,22.2 1,24.2 3,24.2 5,24.2 19,24.2 21,24.2 23,24.2 25,24.2 27,24.2 5,26.2 7,26.2 9,26.2 11,26.2 17,26.2 21,26.2 27,26.2 29,26.2 31,26.2
NetC2_2: C2.2 C4.2 C5.2 U1.26 | length 6.6
  L1 TOP w0.32: U1.26 15.95,5.85 17,4.8 C2.2 C4.2 C5.2
NetC7_2: C7.2 C9.2 C10.2 U1.15 | length 7.5
  L1 TOP w0.32: C10.2 C9.2 C7.2 15,14 15.95,13.05 U1.15
NetC12_2: C12.2 C14.2 C15.2 U1.10 | length 10.3
  L1 TOP w0.32: U1.10 18.45,12.794 18.896,13.24 21.311,13.24 21.818,13.746 21.818,15.968 22.55,16.7 C12.2
NetC16_1: C16.1 U1.9 | length 4.2
  L1 TOP w0.32: U1.9 20.935,12.4 21.305,12.77 21.506,12.77 22.536,13.8 C16.1
NetC17_2: C17.2 U1.12 | length 5.2
  L1 TOP w0.32: U1.12 17.45,13.85 18.47,14.87 18.47,15.92 19.3,16.75 C17.2
NetC20_2: C20.2 C27.2 R3.2 U1.8 | length 7.4
  L1 TOP w0.32: U1.8 20.85,11.65 21.5,12.3 21.701,12.3 21.801,12.4 R3.2 23.95,12.45 23.95,13.75 C20.2 C27.2
NetC21_1: C21.1 U1.14 | length 4.2
  L1 TOP w0.32: U1.14 16.45,16.55 C21.1@16.45,16.6
NetC22_1: C22.1 U1.13 | length 4.7
  L1 TOP w0.32: U1.13 16.95,14.25 17.9,15.2 C22.1
NetC22_2: C22.2 R12.1 | length 1.4
  L1 TOP w0.32: C22.2 17.95,18.25 19.25,18.25 R12.1
NetFB1_1: FB1.1 FB2.2 | length 1.3
  L1 TOP w0.5: FB1.1 FB2.2
NetFB1_2: FB1.2 R10.2 | length 1.2
  L1 TOP w0.5: R10.2 FB1.2
NetL1_2: L1.2 R10.1 R11.1 | length 6.1
  L1 TOP w0.5: L1.2 6.65,20.8 6.95,20.5 R11.1 ; L1.2@4.05,20.8 4.2,20.95 R10.1
NetR1_2: R1.2 R2.1 U1.21 | length 3.6
  L1 TOP w0.32: R2.1 12.8,8.922 13.223,9.345 13.426,9.345 13.731,9.65 U1.21
NetR4_2: R4.2 U2.3 | length 3.5
  L1 TOP w0.3: R4.2 2.25,12.1 2.95,11.4 4.365,11.4 4.916,11.951 U2.3
NetR5_1: R5.1 R6.2 U1.19 | length 3.3
  L1 TOP w0.32: R5.1 R6.2 12.84,10.64 14.69,10.64 U1.19
NetR9_1: R9.1 U3.3 | length 3.4
  L1 TOP w0.3: R9.1 2.25,6.9 2.95,6.2 4.437,6.2 4.887,6.65 U3.3
NetTP4_1: TP4.1 U1.20 | length 5.3
  L1 TOP w0.32: TP4.1 12.7,9.8 12.715,9.815 13.229,9.815 13.564,10.15 U1.20
pads on no net: H1.1 H2.1 H3.1 H4.1 U1.17 U1.18 U1.22 U1.27 U1.28 U1.29 U1.30 U1.31 U1.32 U2.4 U3.4

## Polygon pours and split planes (outlines as drawn)
GND on L1 TOP "GND_L01_P000" (solid, remove dead copper, pour order 0): 2,-0.05 cw(c2,2.2) -0.25,2.2 -0.25,27 cw(c2,27) 1.999,29.25 30.5,29.25 cw(c30.5,27) 32.75,27 32.75,2.2 cw(c30.5,2.2) 30.5,-0.05
GND on L2 GND/POWER "GND_L02_P001" (solid, remove dead copper, pour order 1): 2,-0.05 cw(c2,2.2) -0.25,2.2 -0.25,27 cw(c2,27) 1.999,29.25 30.5,29.25 cw(c30.5,27) 32.75,27 32.75,2.2 cw(c30.5,2.2) 30.5,-0.05
GND on L3 GND "GND_L03_P002" (solid, remove dead copper, pour order 2): 2,-0.05 cw(c2,2.2) -0.25,2.2 -0.25,27 cw(c2,27) 1.999,29.25 30.5,29.25 cw(c30.5,27) 32.75,27 32.75,2.2 cw(c30.5,2.2) 30.5,-0.05
GND on L4 BOTTOM "GND_L04_P003" (solid, remove dead copper, pour order 3): 2,-0.05 cw(c2,2.2) -0.25,2.2 -0.25,27 cw(c2,27) 1.999,29.25 30.5,29.25 cw(c30.5,27) 32.75,27 32.75,2.2 cw(c30.5,2.2) 30.5,-0.05

## Keep-outs
Keep-Out Layer:
  the board outline again, w0.5

## Text inside footprints (layer, text, board x,y; h text height)
U1: Top Assembly "1" at 19.486,7.995 h0.76 r90